# Altium PCB PCB.PcbDoc
Units mm, origin at the board's own origin, x right, y up, seen from the top; angles counter-clockwise.
Board outline 43.94 x 41.66 mm, 2 copper layers (Top Layer, Bottom Layer), stack 1.569 mm thick; 17 components, 12 nets, 52 pads, 0 vias.
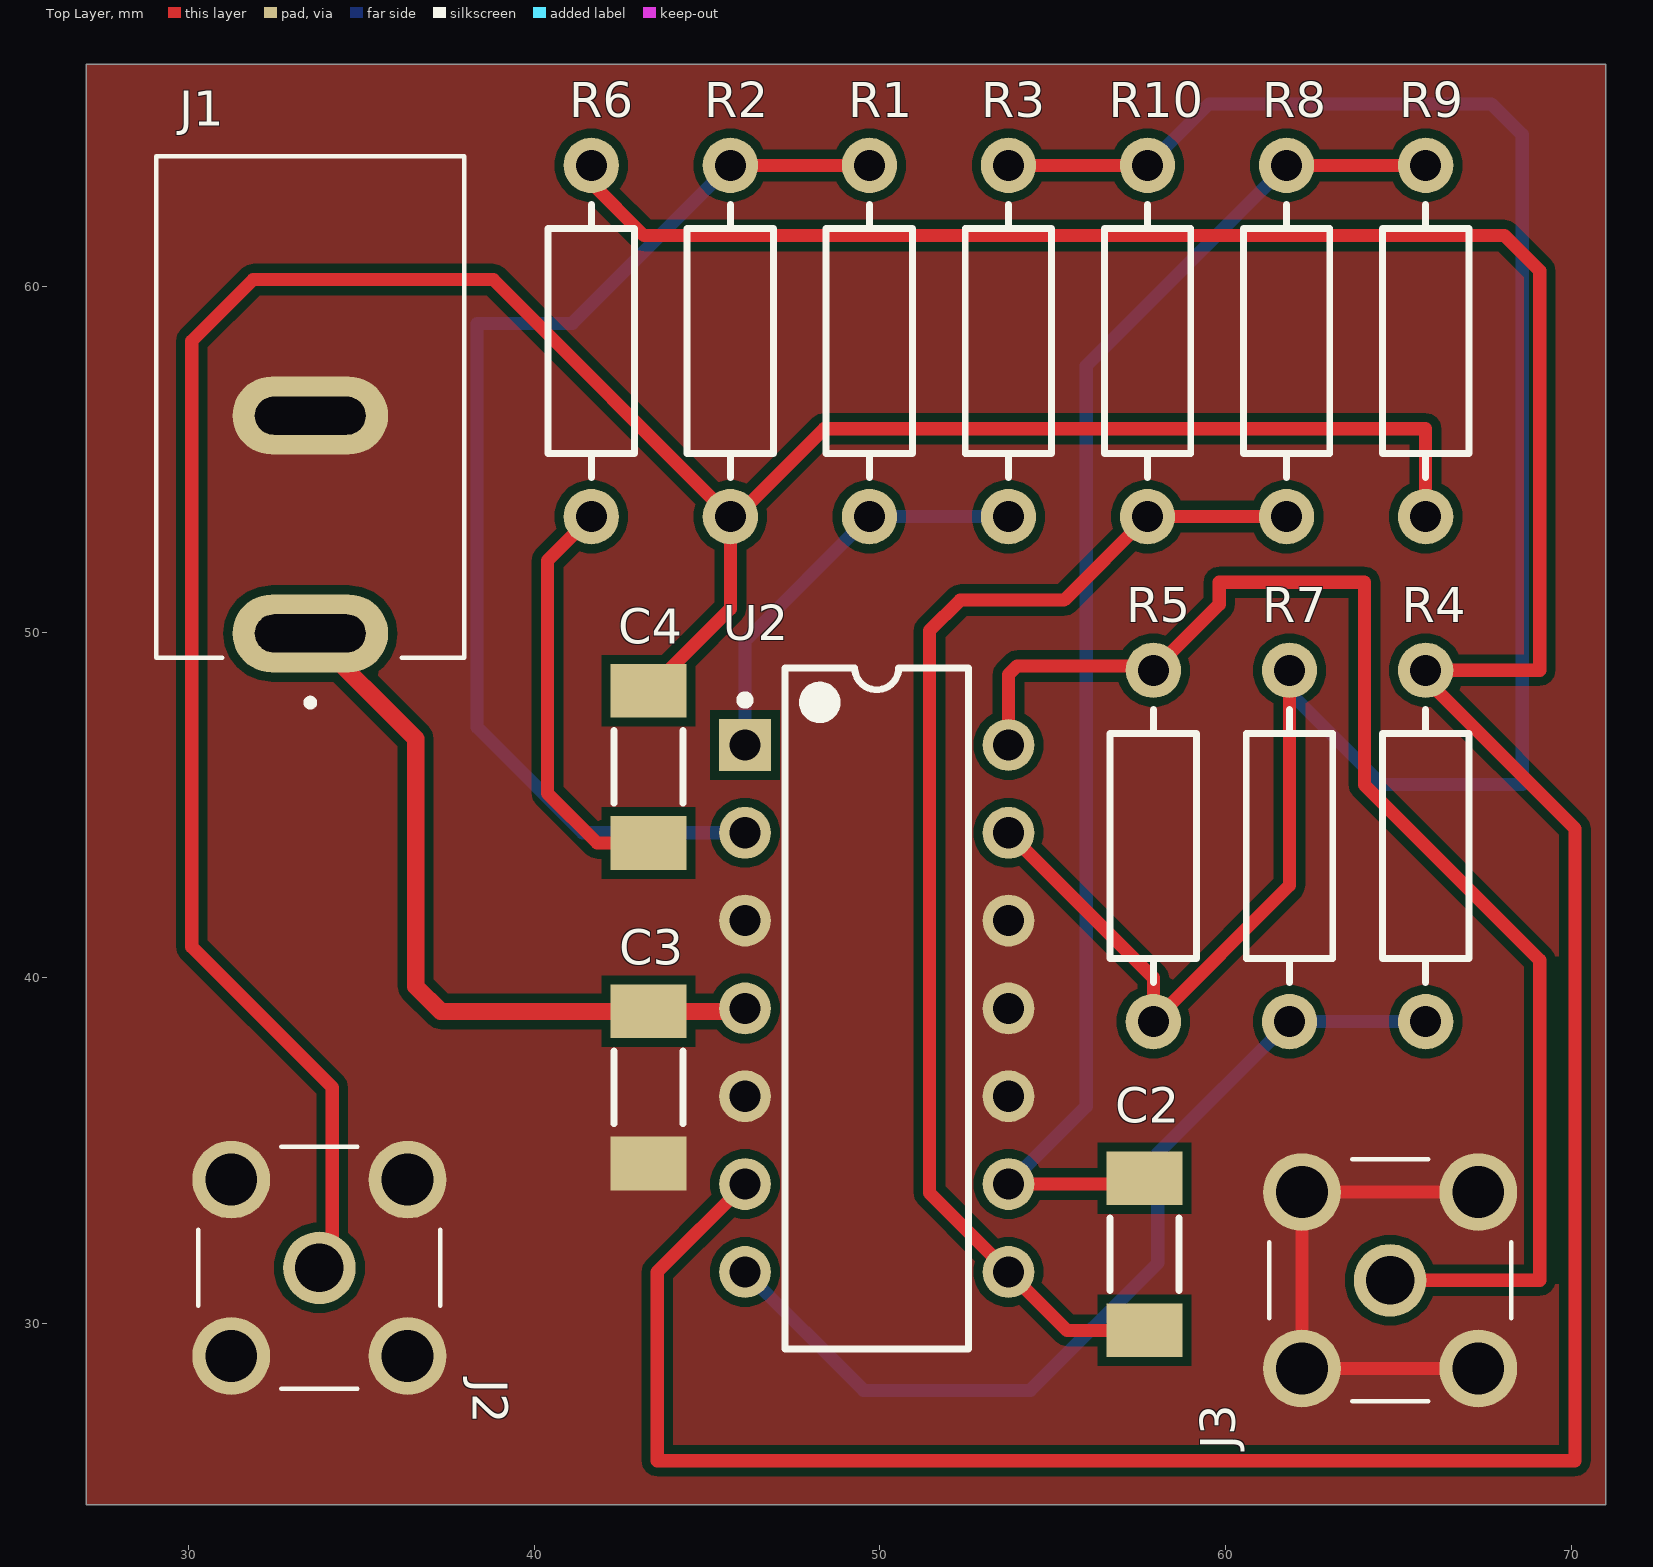
[diagram p0: Top Layer view]
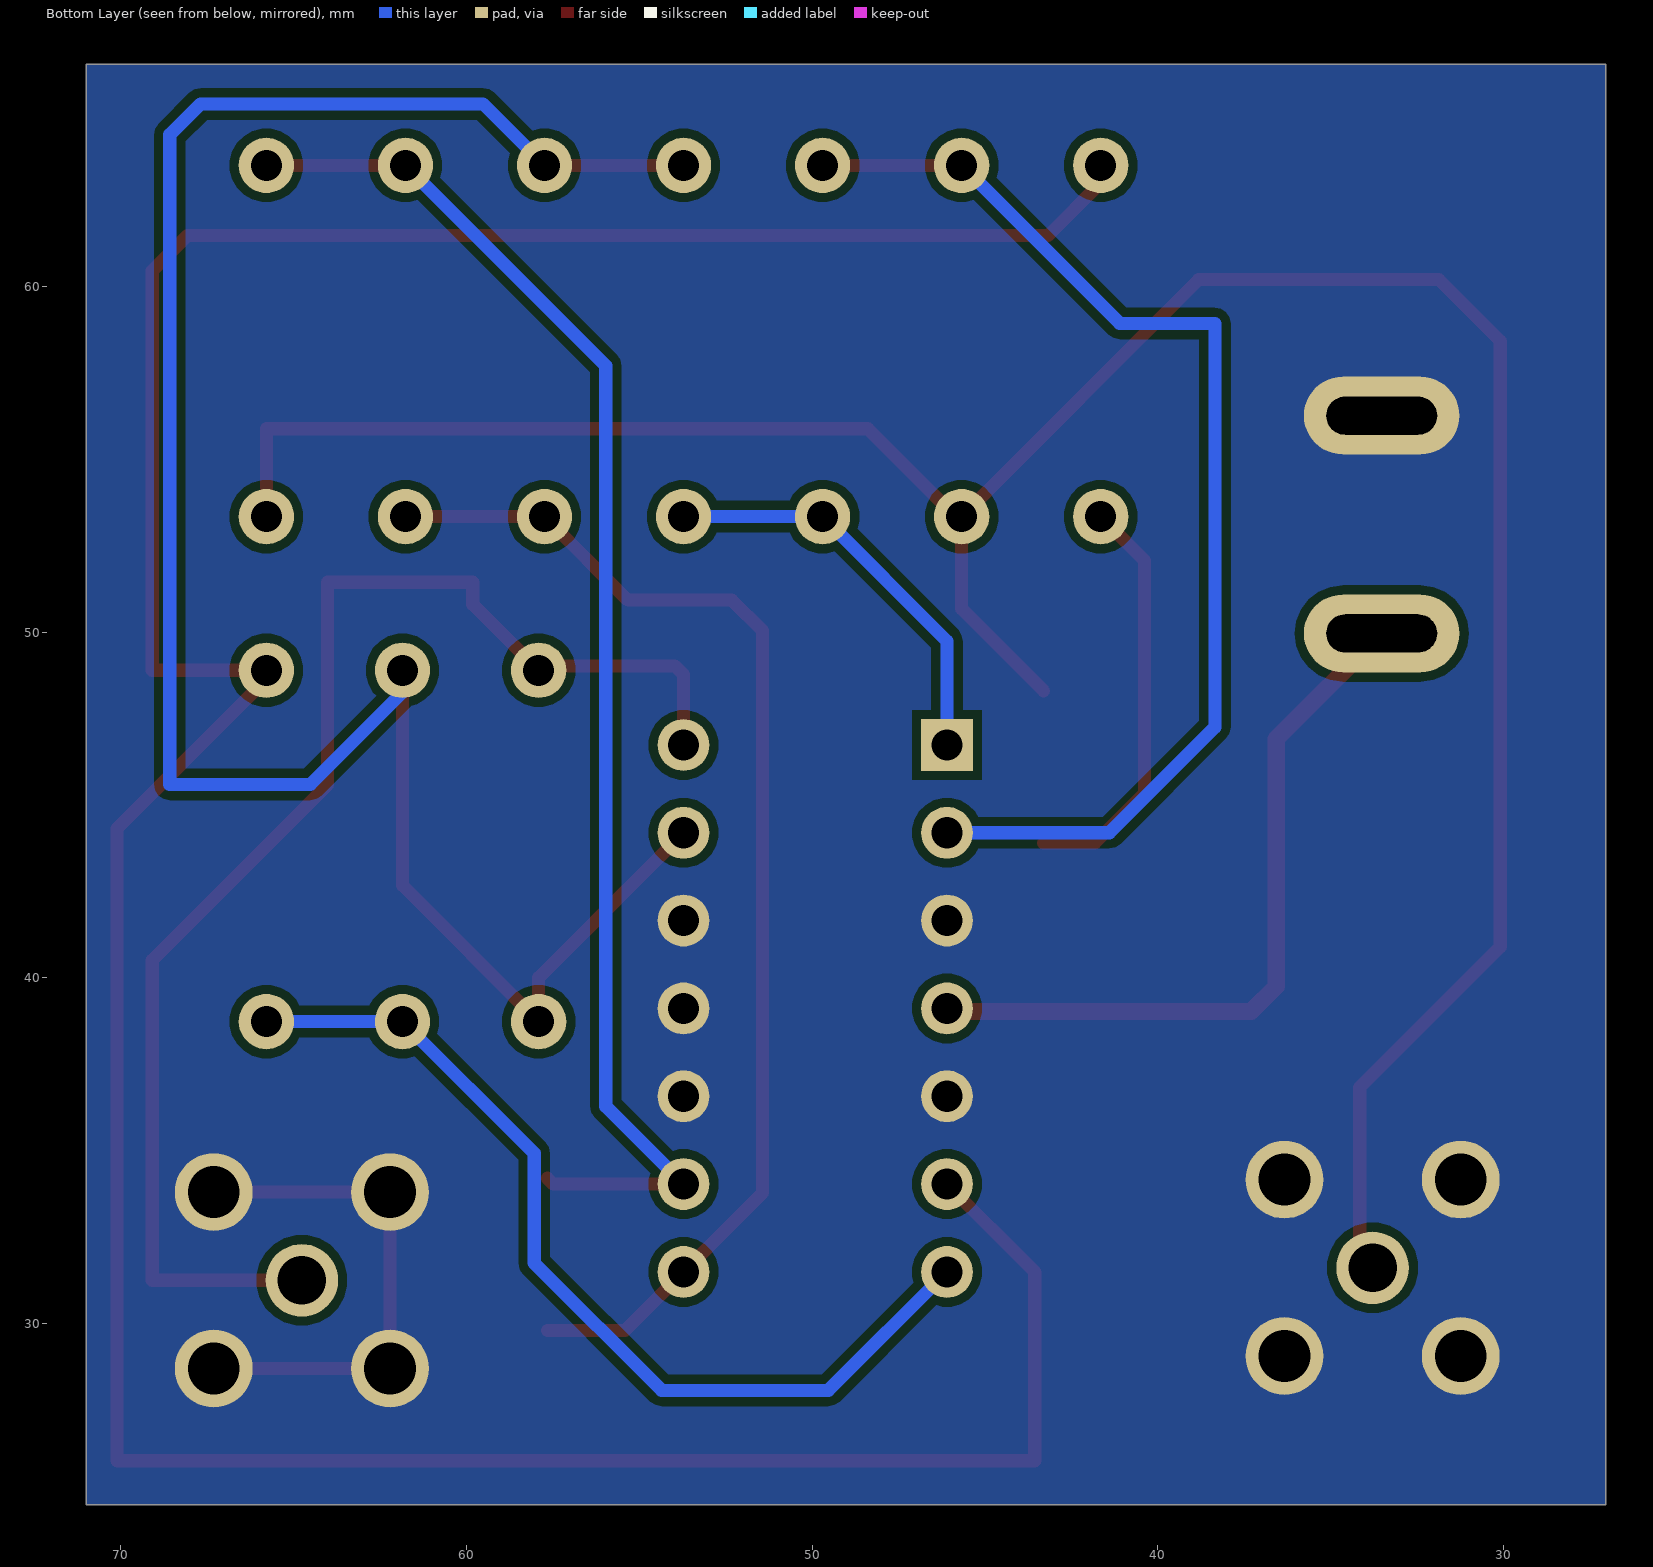
[diagram p1: Bottom Layer view, seen from below]
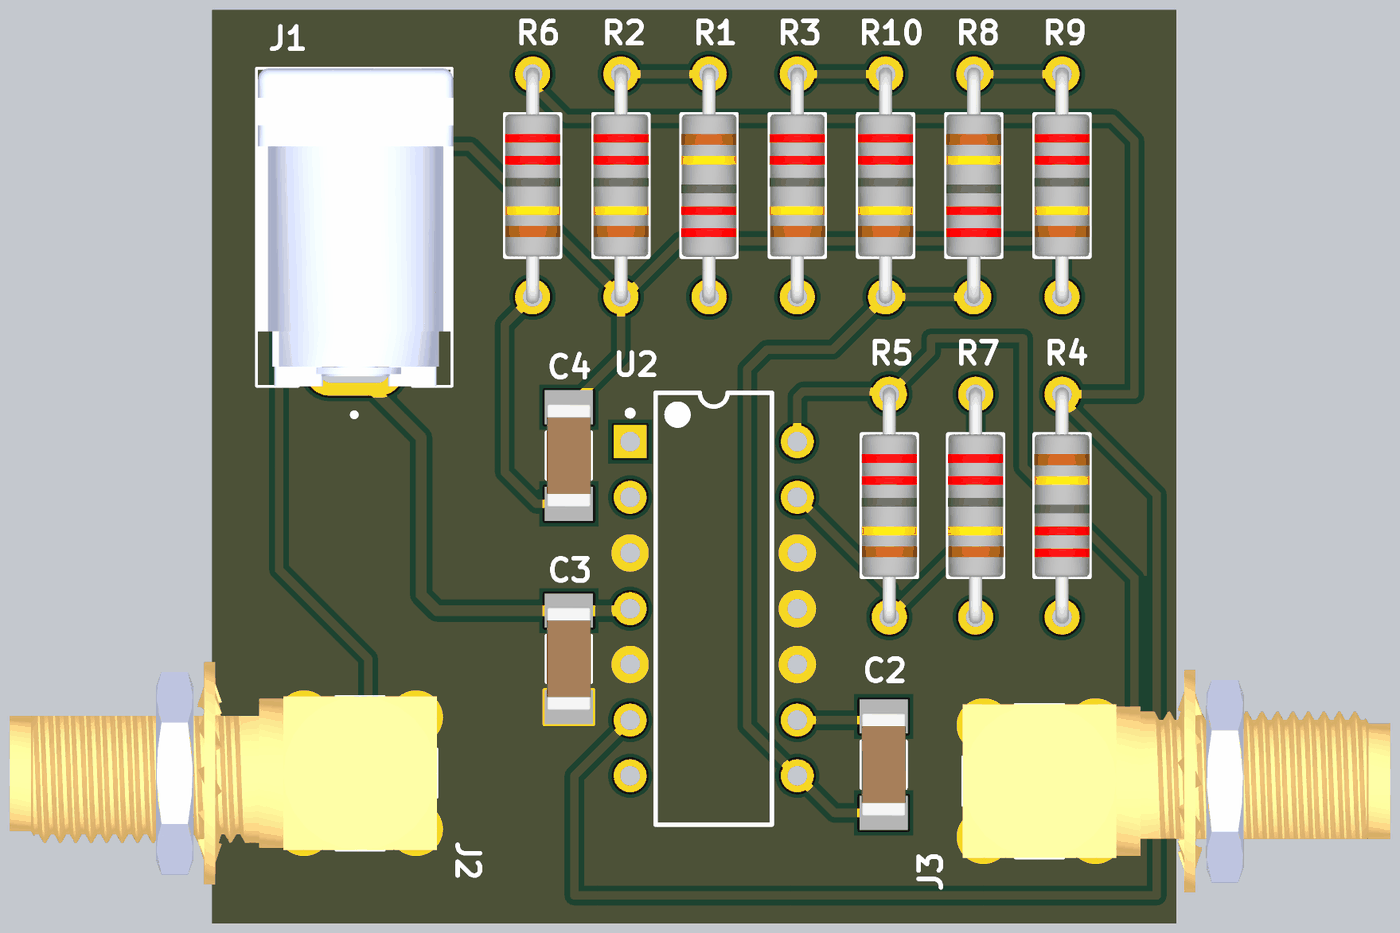
[diagram p2: 3D render of the assembled board from above, using the file's embedded part models]

## Layer stack, top to bottom
Top Solder: solder mask 0.0254, SM-001, Dk 4
Top Layer: signal copper 0.035
Dielectric 1: core 1.4986, Core-043, Dk 4.3
Bottom Layer: signal copper 0.035
Bottom Solder: solder mask 0.0254, SM-001, Dk 4

## Board outline
70.993,24.765 27.051,24.765 27.051,66.421 70.993,66.421

## Design rules (kind name [scope] priority, off if disabled: settings)
Clearance [All] p1: gap=0.254 ignorepadtopadclearanceinfootprint=FALSE
PolygonConnect [All] p1: connectstyle=Direct reliefconductorwidth=0.254 reliefentries=4 polygonreliefangle="90 Angle" airgapwidth=0.254
RoutingVias [All] p1: holewidth=0.711 width=1.27 viastyle="Through Hole" minholewidth=0.711 minwidth=1.27 maxholewidth=0.711 maxwidth=1.27
SolderMaskExpansion [All] p1: expansion=0.102 istentingtop=FALSE
SupplyNets "Schematic Supply Nets_1" [InNet('V+')] p1: voltage=0.000
SupplyNets "Schematic Supply Nets" [InNet('GND')] p2: voltage=0.000
Width [All] p1: maxlimit=0.5 minlimit=0.15 preferedwidth=0.254 minimp=50.000000 maximp=50.000000 favimp=50.000000
30 further rules are at their usual default settings.

## Components (designator, comment, footprint, x,y, rotation, side; value= is the part's Value field where it differs from the comment)
C2 "1uF" CAPC4720X215N 57.658,32.004 r270 top
C3 "100nF" CAPC4720X215N 43.307,36.83 r90 top
C4 "100nF" CAPC4720X215N 43.307,46.101 r270 top
J1 "*" CUI_PJ-037B 33.528,49.961 r90 top
J2 "*" LINX_CONSMA002-L-G 33.792,31.613 r270 top
J3 "*" LINX_CONSMA002-L-G 64.76,31.252 r90 top
R1 "20k" RES1016-650X250 49.699,58.42 r270 top
R2 "10k" RES1016-650X250 45.678,58.42 r90 top
R3 "10k" RES1016-650X250 53.721,58.42 r90 top
R4 "100k" RES1016-650X250 65.786,43.815 r270 top
R5 "10k" RES1016-650X250 57.912,43.815 r90 top
R6 "10k" RES1016-650X250 41.656,58.42 r90 top
R7 "10k" RES1016-650X250 61.849,43.815 r90 top
R8 "10Meg" RES1016-650X250 61.764,58.42 r270 top
R9 "100k" RES1016-650X250 65.786,58.42 r90 top
R10 "10k" RES1016-650X250 57.743,58.42 r90 top
U2 "LM324N" N0014A 49.911,39.116 r0 top

## Footprints (in the part's own frame and the unit in brackets; to place one, negate y for a bottom-side part, rotate by r counter-clockwise, add the part's x,y. Pads: shape width x height; smd on the part's side, far side on the other; paste and mask are expansions set on the pad)
CAPC4720X215N [mm] "Capacitor, Non-Polarized, Chip; 4.7mm L X 2mm W X 2.15mm H, IPC Medium Density"
  rect 1.55x2.2 smd: 1(-2.2,0) 2(2.2,0)
  silkscreen extent -1.05,-1 1.05,1, body extent -2.35,-1 2.35,1, height 2.15
CUI_PJ-037B [mm]
  oval 2.25x4.5 hole 1.1 slot 3.2 at 90 deg: 1(0,0) 2(6.3,0)
  silkscreen extent -2.1,-4.45 13.8,4.45, body extent -0.7,-4.51 13.8,4.39, height 10.91
LINX_CONSMA002-L-G [mm]
  round 2.1 hole 1.4: 1(0,0)
  round 2.25 hole 1.5: S1(-2.55,2.55) S2(-2.55,-2.55) S3(2.55,-2.55) S4(2.55,2.55)
  silkscreen extent -3.5,-3.5 3.5,3.5, body extent -5.1,-16 5.1,3.5, height 11.7
N0014A [mm] "DIP, 14-Leads, Body 19.7x6.6mm, Pitch 2.54mm"
  rect 1.5x1.5 hole 0.9: 1(-3.81,7.62)
  round 1.5 hole 0.9: 2(-3.81,5.08) 3(-3.81,2.54) 4(-3.81,0) 5(-3.81,-2.54) 6(-3.81,-5.08) 7(-3.81,-7.62) 8(3.81,-7.62) 9(3.81,-5.08) 10(3.81,-2.54) 11(3.81,0) 12(3.81,2.54) 13(3.81,5.08) 14(3.81,7.62)
  silkscreen extent -3.93,-9.85 2.65,9.85, body extent -3.95,-9.85 3.95,9.85, height 5.08
RES1016-650X250 [mm] "Resistor, Axial, Pad spacing 10.16 mm - Body Lengh 6.5mm X Body Diameter 2.5mm"
  round 1.6 hole 0.9: 1(-5.08,0) 2(5.08,0)
  silkscreen extent -3.95,-1.25 3.95,1.25, body extent -5.38,-1.27 5.38,1.26, height 2.51

## Part data
C2 C3 C4: library part Capacitor, "Non-polarised capacitor"
J1: library part "DC Power Jack Connector", "2.5 x 6.5 mm, 2.5 A, Horizontal, Through Hole, Dc Power Jack Connector"
J2 J3: library part Coax_1Female_1Shield, "SMA Jack 50 Ohm PCB Through Hole"
R1 R2 R3 R4 R5 R6 R7 R8 R9 R10: library part Resistor, "Resistor"
U2: "Low Power Quad Operational Amplifier, 14-pin MDIP", Manufacturer="Texas Instruments", ComponentLink1Description="Datasheet URL", ComponentLink1URL=http://www.ti.com/general/docs/lit/getliterature.tsp?genericPartNumber=LM324&fileType=pdf

## Nets (pads, with @x,y where several pads share a name; then routed paths per layer and width w, separated by ;. In a path a pad name is that pad's centre, name@x,y a point inside that pad or via, vN(x,y) a via of type N, cw(c..) or ccw(c..) an arc to the next point about the centre after c; other vN are vias at no path point)
GND: C3.1 J1.2 J2.S1 J2.S2 J2.S3 J2.S4 J3.S1 J3.S2 J3.S3 J3.S4 U2.3 U2.5 U2.10 U2.11 U2.12 | length 15.3
  Top Layer w0.381: J3.S2 J3.S1 J3.S4 J3.S3
input: C4.1 J2.1 R2.1 R9.1 | length 77.5
  Top Layer w0.381: J2.1 34.163,31.984 34.163,36.83 30.099,40.894 30.099,58.42 31.877,60.198 38.82,60.198 R2.1 ; C4.1 45.678,50.672 R2.1 ; R9.1 65.786,55.88 48.387,55.88 45.847,53.34 R2.1
NetC2_1: C2.1 R8.1 R9.2 U2.9 | length 40.8
  Top Layer w0.381: U2.9 57.49,34.036 C2.1 ; R8.1 R9.2
  Bottom Layer w0.381: U2.9 55.968,36.283 55.968,57.704 R8.1
NetC2_2: C2.2 R8.2 R10.1 U2.8 | length 35.8
  Top Layer w0.381: C2.2 55.413,29.804 U2.8 51.435,33.782 51.435,50.038 52.324,50.927 55.33,50.927 R10.1 R8.2
NetC4_2: C4.2 R6.1 | length 12
  Top Layer w0.381: R6.1 40.386,52.07 40.386,45.339 41.824,43.901 C4.2
NetR1_1: R1.1 R2.2 U2.2 | length 33.9
  Top Layer w0.381: R2.2 R1.1
  Bottom Layer w0.381: R2.2 41.106,58.928 38.354,58.928 38.354,47.244 41.402,44.196 U2.2
NetR1_2: R1.2 R3.1 U2.1 | length 12.1
  Bottom Layer w0.381: U2.1 46.101,49.742 R1.2 R3.1
NetR3_2: R3.2 R5.1 R7.2 R10.2 U2.13 | length 62.2
  Top Layer w0.381: U2.13 57.912,40.005 R5.1 61.849,42.672 R7.2 ; R3.2 R10.2
  Bottom Layer w0.381: R10.2 59.521,65.278 67.691,65.278 68.58,64.389 68.58,45.593 64.516,45.593 61.849,48.26 R7.2
NetR4_1: R4.1 R6.2 U2.6 | length 104.1
  Top Layer w0.381: R6.2 41.656,62.992 43.18,61.468 68.072,61.468 69.088,60.452 69.088,48.895 66.167,48.895 R4.1 65.786,48.641 70.104,44.323 70.104,26.035 67.564,26.035 43.561,26.035 43.561,31.496 U2.6
NetR4_2: R4.2 R7.1 U2.7 | length 27.4
  Bottom Layer w0.381: U2.7 49.53,28.067 54.356,28.067 58.039,31.75 58.039,34.925 R7.1 R4.2
output: J3.1 R5.2 U2.14 | length 40.5
  Top Layer w0.381: U2.14 53.721,48.768 53.975,49.022 57.785,49.022 R5.2 59.817,50.8 59.817,51.444 64.017,51.444 64.017,45.584 69.089,40.512 69.089,31.252 65.092,31.252 J3.1
V+: C3.2 J1.1 U2.4 | length 21.3
  Top Layer w0.5: J1.1 36.576,46.913 36.576,39.751 37.297,39.03 C3.2 46.015,39.03 U2.4

## Polygon pours and split planes (outlines as drawn)
GND on Bottom Layer "GND_L02_P002" (solid, pour order 2): 27.051,66.421 70.993,66.421 70.993,24.765 27.051,24.765
GND on Top Layer "GND_L01_P003" (solid, pour order 3): 27.051,24.765 70.993,24.765 70.993,66.421 27.051,66.421